# Altium PCB Gear_Trak-v1.0.PcbDoc (part 5 of 5)
Units mil, origin at the board's own origin, x right, y up, seen from the top; angles counter-clockwise.
Board outline 1383 x 2953 mil, 6 copper layers (TOP LAYER, GROUND1, SIGNAL, GROUND2, POWER, BOTTOM LAYER), stack 60.865 mil thick; 166 components, 125 nets, 751 pads, 771 vias.
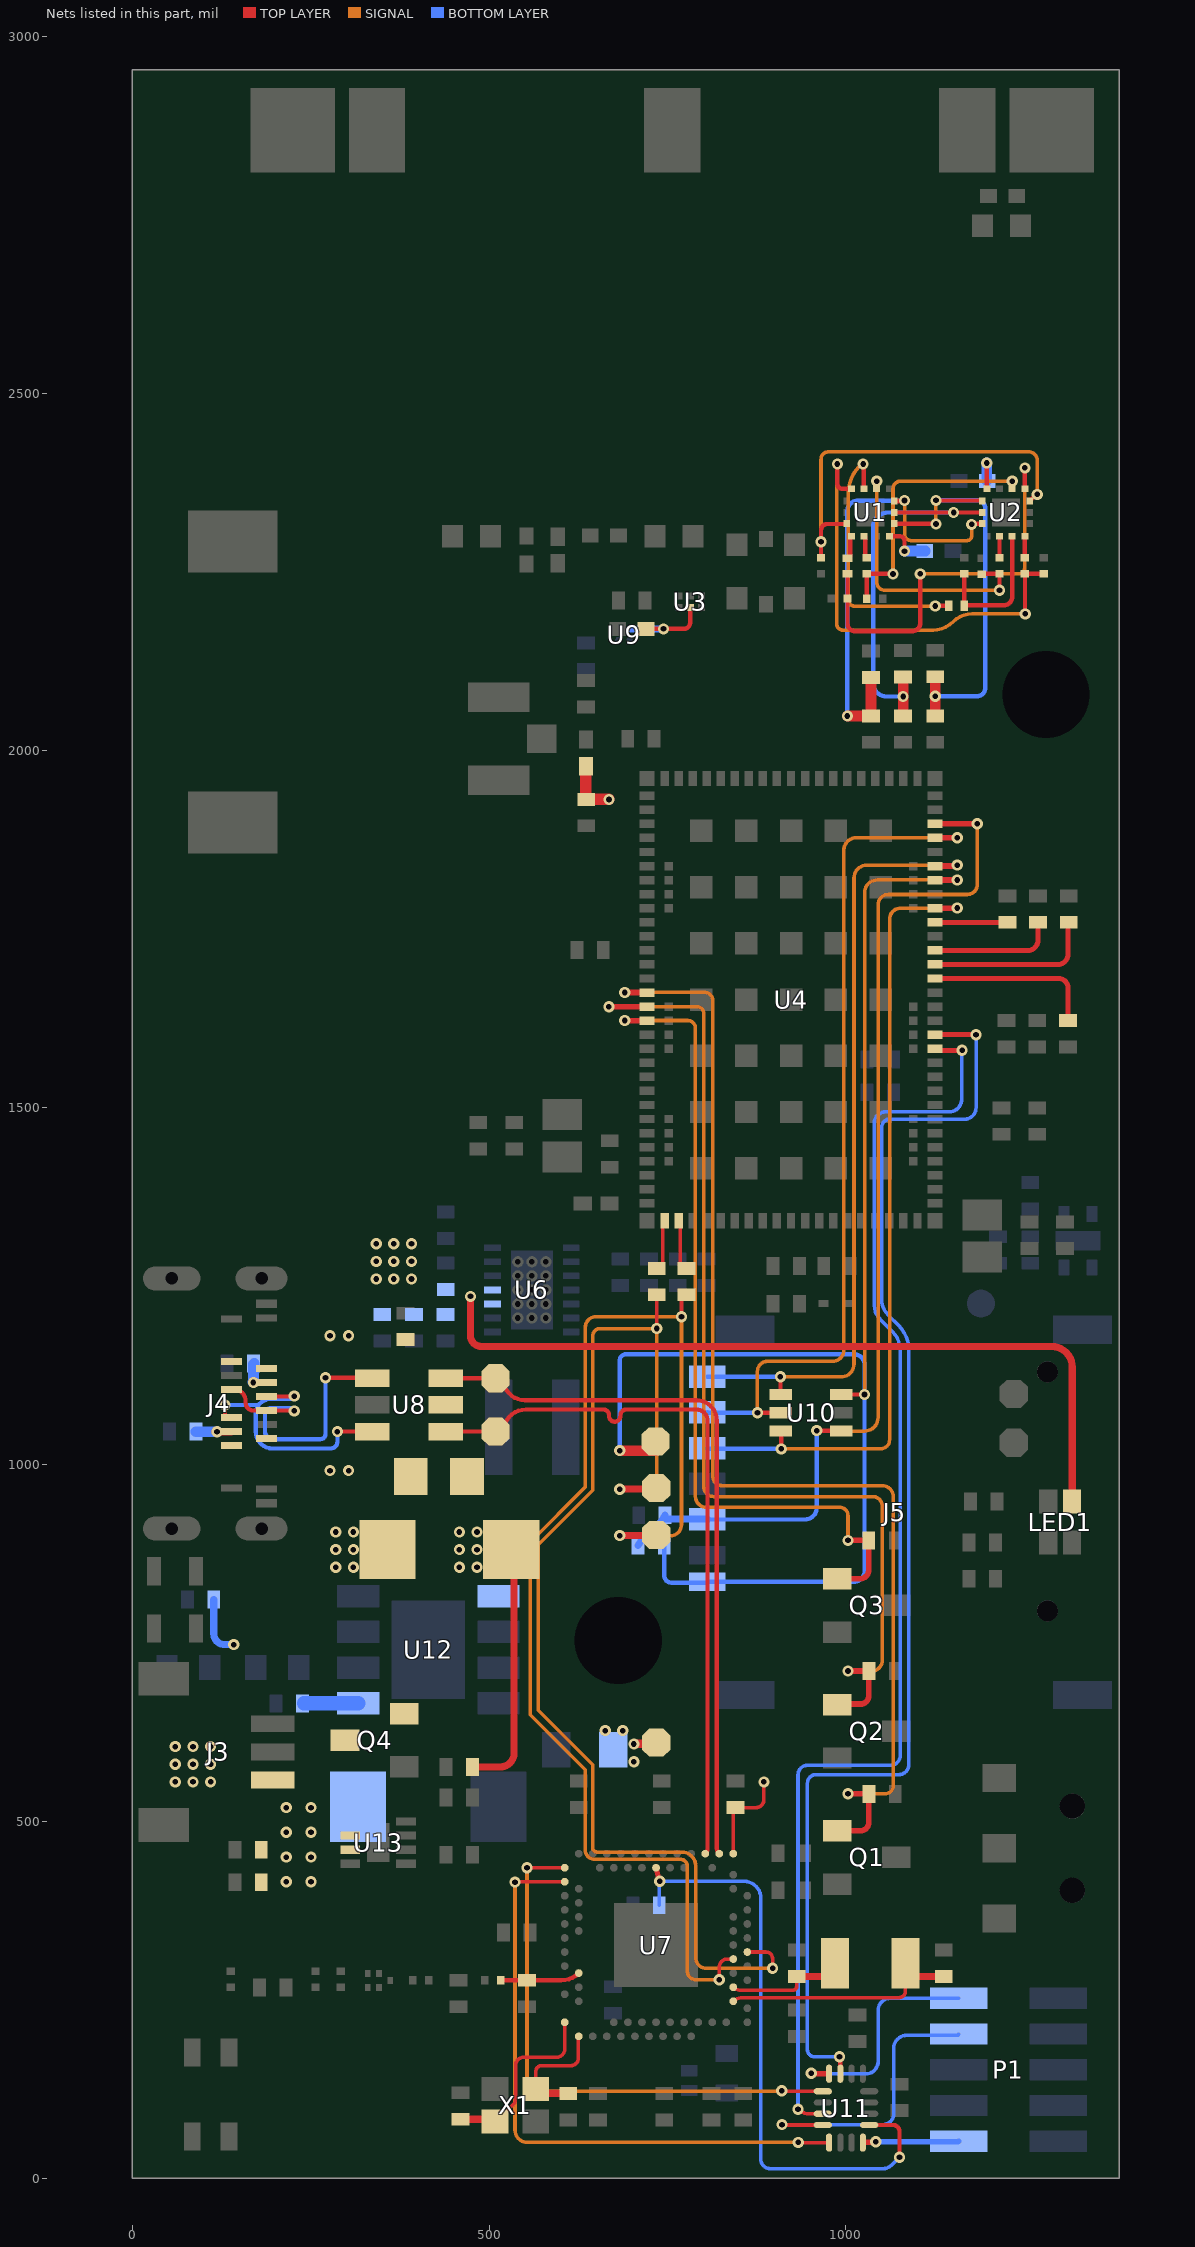
[diagram p7: the nets of this part, all layers, seen from the top]

## Via types
v1: diameter 15.75, hole 7.87, TOP LAYER to BOTTOM LAYER, tented both sides, 771 vias

## Nets (pads, with @x,y where several pads share a name; then routed paths per layer and width w, separated by ;. In a path a pad name is that pad's centre, name@x,y a point inside that pad or via, vN(x,y) a via of type N, cw(c..) or ccw(c..) an arc to the next point about the centre after c; other vN are vias at no path point) (continued)
NetR39_2: R39.2 U4.38 | length 239.8
  TOP LAYER w7: U4.38@1124.57,1680.31 1297.86,1680.31 cw(c1297.86,1667.16) 1311,1667.16 R39.2@1311,1621.25
NetR40_2: R40.2 U4.39 | length 239.8
  TOP LAYER w7: U4.39@1124.57,1699.99 1296.84,1699.99 ccw(c1296.84,1714.15) 1311,1714.15 1311,1758.05 R40.2@1312,1759.05
NetR41_2: R41.2 U4.40 | length 177.6
  TOP LAYER w7: U4.40@1124.57,1719.68 1254.68,1719.68 ccw(c1254.68,1734) 1269,1734 R41.2@1269,1759.05
NetR42_2: R42.2 U4.42 | length 101.4
  TOP LAYER w7: U4.42@1124.57,1759.05 R42.2@1226,1759.05
NetR43_1: R43.1 U4.2 | length 72.3
  TOP LAYER w5: R43.1@735,1274.29 736.97,1274.29 743.47,1280.79 743.47,1338.57 U4.2@745.83,1340.94
NetR44_1: R44.1 U4.3 | length 72.4
  TOP LAYER w5: U4.3@765.52,1340.94 767.98,1338.47 767.98,1280.79 774.48,1274.29 R44.1@776.52,1274.29
NetU4_33: U4.33 U11.3 | length 1809.9
  TOP LAYER w5: v1(932.81,96.51) ccw(c948.22,111.92) 948.22,90.13 U11.3@967.52,90.13
  TOP LAYER w7: U4.33@1124.7,1579.76 v1@1162.56,1579.76
  BOTTOM LAYER w5: v1(932.81,96.51) 932.81,565 cw(c945.89,565) 945.89,578.08 1061.87,578.08 ccw(c1061.87,592.21) 1076,592.21 1076,1159.31 ccw(c1038.43,1159.31) 1065.02,1185.85 1047.43,1203.43 ; 1047.42,1203.45 cw(c1066.07,1222.07) 1039.72,1222.07 1039.72,1477.66 cw(c1055.54,1477.66) 1055.54,1493.49 1144.54,1493.49 ccw(c1144.54,1510.94) 1162,1510.94 1162,1579.64 v1(1162.68,1579.64)
NetU4_34: U4.34 U11.15 | length 1818.2
  TOP LAYER w5.98: v1@991.9,169.94 cw(c986.14,168.31) 992.13,168.31 U11.15@992.13,146.23 ; U4.34@1124.57,1601.57 U4.34@1124.7,1601.45
  TOP LAYER w7: U4.34@1124.7,1603.45 1126.52,1601.62 1182.13,1601.62 v1(1182.19,1601.68)
  BOTTOM LAYER w5: v1(990.9,169.95) 956.05,169.95 cw(c956.05,180) 946,180 946,553.25 cw(c957.94,553.25) 957.94,565.19 1074.04,565.19 ccw(c1074.04,579.16) 1088,579.16 1088,1159.45 1088,1159.51 ccw(c1038.56,1159.49) 1073.49,1194.48 1059.19,1208.78 cw(c1081.38,1230.97) 1050,1230.97 1050,1471.94 cw(c1061.38,1471.94) 1061.38,1483.32 1166.38,1483.32 ccw(c1166.38,1499.13) 1182.19,1499.13 v1(1182.19,1601.68)
nRF52_ANT: C33.2 L13.1 U7.H23 | length 112
  TOP LAYER w6.17: L13.1@516.34,277 516.42,277.08 C33.2@553,277.08 601.38,277.08 ccw(c601.38,311.37) U7.H23@625.63,287.13
nRF52_RST: C41.1 U7.AC13 U11.9 | length 866.1
  TOP LAYER w5.98: U11.9@1032.48,74.38 1065.62,74.38 cw(c1065.62,65) 1075,65 v1(1075,29.19) v1@1075,29
  TOP LAYER w7: U7.AC13@733.9,434.76 v1@738.97,415.83
  BOTTOM LAYER w5: C41.1@738.5,382.21 738.5,415.78 v1(739.05,415.78) 857.22,415.78 cw(c857.22,392.33) 880.67,392.33 880.67,26.58 ccw(c894,26.58) 894,13.25 1052.17,13.25 ccw(c1052.17,29.19) 1063.3,17.78 v1(1075,29.19)
nRF52_SWDCLK: U7.AA24 U11.5 | length 866.9
  TOP LAYER w5: v1@536.33,415.04 605.91,415.04 U7.AA24@605.94,415.08 ; v1@933.19,49.77 U11.5@976.38,49.77
  SIGNAL w5: v1(536.33,414.65) 536.33,67.26 ccw(c553.6,67.26) 553.6,50 v1(933.19,50)
nRF52_SWDIO: U7.AC24 U11.1 | length 767.8
  TOP LAYER w5: v1@553.16,434.69 605.87,434.69 U7.AC24@605.94,434.76 ; v1@915.96,122.23 916.27,121.93 967.22,121.93 U11.1@967.52,121.62
  SIGNAL w5: v1(553.16,434.62) 553.16,137.02 ccw(c568.46,137.02) 568.46,121.72 v1@909.96,121.72
  other v1: 909.96,122.23
RESET: P1.10 U11.8 | length 135
  TOP LAYER w7.87: U11.8@1023.62,49.77 1023.62,49.9 1023.99,50.26 1041.08,50.26 v1(1041.57,50.75)
  BOTTOM LAYER w7.87: v1(1041.57,50.75) 1156.68,50.75 P1.10@1157.71,51.78
RF_SW1: R4.2 R9.1 U1.7 U2.7 | length 688.8
  TOP LAYER w6.17: v1@1175.98,2317.32 U2.7@1190.64,2317.32
  TOP LAYER w7: U1.7@1067.36,2348.82 v1@1082.02,2348.82
  TOP LAYER w15: R4.2@1032.52,2048 v1(1002,2048) 1002.13,2048.13 1002.2,2048.07 1034.94,2048.07 R4.2@1035.01,2048.13 ; R9.1@1035.01,2101.87 R4.2@1035.01,2048.13 ; R4.2@1035.5,2048.13 R4.2@1035.01,2048.13
  SIGNAL w4.92: v1@1082.02,2348.77 1082.02,2302.57 ccw(c1090.77,2302.57) 1090.77,2293.81 1169.77,2293.81 ccw(c1169.77,2300.03) 1176,2300.03 v1@1176,2317.38
  BOTTOM LAYER w6.17: v1(1002,2048) 1002,2335.05 cw(c1016.72,2335.05) 1016.72,2349.77 v1(1082.02,2349.77)
  other v1: 1175.98,2316.38
RF_SW2: R5.2 R8.1 U1.6 U2.6 | length 573.1
  TOP LAYER w6.17: U1.6@1067.41,2333.02 U2.6@1190.64,2333.02
  TOP LAYER w15: R5.2@1080.01,2048.13 v1(1080.01,2075.35) R8.1@1080.01,2102.57
  BOTTOM LAYER w6.17: v1(1080.01,2075.35) 1056.65,2075.35 cw(c1056.65,2094.04) 1037.96,2094.04 1037.96,2311.98 cw(c1059.06,2311.98) 1059.06,2333.08 v1(1150.68,2333.08)
RF_SW3: R6.2 R7.1 U1.5 U2.5 | length 614.3
  TOP LAYER w6.17: U1.5@1067.36,2317.32 1067.52,2317.16 1125.84,2317.16 v1(1126,2317) ; v1@1126,2349 v1@1126.09,2348.91 ; v1@1126.09,2349.91 U2.5@1190.55,2349.91 ; U2.5@1190.55,2348.91 U2.5@1190.64,2348.82
  TOP LAYER w15: R6.2@1125.01,2048.13 v1(1125.01,2075.57) R7.1@1125.01,2103
  SIGNAL w4.92: v1(1126,2317) v1@1126,2349
  BOTTOM LAYER w6.17: v1(1125.01,2075.57) 1183.31,2075.57 ccw(c1183.31,2087.42) 1195.17,2087.42 1195.17,2338.99 ccw(c1184.16,2338.99) 1184.16,2350 v1(1126,2350)
RXD: R43.2 TP8.1 U7.L1 | length 1705.3
  TOP LAYER w5: v1@682,965 v1(683.18,965) ; TP8.1@732.74,965 TP8.1@734.18,966.43 ; v1(735,1190) R43.2@735,1237.29 ; U7.L1@861.85,316.65 887.88,316.65 cw(c887.88,307.35) 897.19,307.35 v1(897.19,293.86)
  TOP LAYER w10: v1(683.18,965) TP8.1@732.74,965
  SIGNAL w5: v1@684,965 725,965 ccw(c725,975) 735,975 v1(735,1190) 655.94,1190 ccw(c655.94,1179.24) 645.18,1179.24 645.18,963.42 568.85,887.09 568.85,655.29 645.18,578.96 645.18,462.83 ccw(c651.35,462.83) 651.35,456.66 770.24,456.66 cw(c770.24,437.5) 789.4,437.5 789.4,308.7 ccw(c804.32,308.7) 804.32,293.77 897.1,293.77 v1(897.19,293.86)
SIM_1V8: C59.2 J5.C1 R17.1 U4.49 U10.1 | length 1537.7
  TOP LAYER w5.98: v1(959,1047) 959.3,1046.7 993.03,1046.7 U10.1@993.32,1046.41
  TOP LAYER w7.87: U4.49@1124.71,1896.98 1124.76,1896.92 1183.92,1896.92 v1(1184,1897)
  SIGNAL w5: v1(959,1047) 959,1046.35 1026,1046.35 ccw(c1026,1065.35) 1045,1065.35 1045,1784 cw(c1059,1784) 1059,1798 1170,1798 ccw(c1170,1812) 1184,1812 v1(1184,1897)
  BOTTOM LAYER w5.98: J5.C1@805.94,922.56 942.46,922.56 ccw(c942.46,939.1) 959,939.1 v1(959,1047)
  BOTTOM LAYER w10: R17.1@708.5,886 715,896 740.18,918.38 C59.2@746.68,928.38 ; C59.2@746.68,923.38 805.11,923.38 cw(c805.11,922.56) J5.C1@805.94,922.56
SIM_CLK: J5.C3 U4.46 U10.4 | length 1107.7
  TOP LAYER w5.98: v1(908.18,1122.56) 908.18,1098.09 U10.4@908.68,1097.59
  TOP LAYER w7.87: U4.46@1124.71,1837.92 v1@1155.87,1837.92
  SIGNAL w5: v1(908.18,1122.56) 992.79,1122.21 ccw(c992.97,1140.44) 1011.2,1140.44 1011.2,1821 cw(c1029.26,1821) 1029.26,1839.06 v1@1156,1839.06
  BOTTOM LAYER w5.98: J5.C3@805.94,1122.56 v1(908.18,1122.56)
  other v1: 1156,1839.16
SIM_DET: J5.CD R17.2 TP2.1 U4.45 U10.3 | length 2066.7
  TOP LAYER w5.98: U10.3@993.32,1097.59 v1(1026,1097.59)
  TOP LAYER w7.87: U4.45@1124.71,1818.24 v1@1155.87,1818.24
  TOP LAYER w15: v1(683,1019) TP2.1@734,1019
  SIGNAL w5: v1(1026,1097.59) 1026,1800.33 cw(c1044.04,1800.33) 1044.04,1818.37 v1@1156,1818.37
  BOTTOM LAYER w5.98: v1(683,1019) 683,1145 cw(c692,1145) 692,1154 1011,1154 cw(c1011,1139) 1026,1139 v1(1026,1097.59) 1026,850.76 cw(c1010.4,850.76) 1010.4,835.16 J5.CD@805.94,835.16 cw(c804.78,835.16) 804.78,834 755.16,834 cw(c755.16,843.66) 745.5,843.66 R17.2@745.5,886
  other v1: 1156,1818.27
SIM_IO: J5.C7 U4.48 U10.5 | length 1199.5
  TOP LAYER w5.98: v1(876,1072) U10.5@908.68,1072
  TOP LAYER w7.87: U4.48@1124.71,1877.29 v1@1155.87,1877.29
  SIGNAL w5: v1(876,1072) 876,1130 cw(c890,1130) 890,1144 981,1144 ccw(c981,1160) 997,1160 997,1860 cw(c1014.43,1860) 1014.43,1877.43 v1(1156,1877.43)
  BOTTOM LAYER w5.98: J5.C7@805.94,1072.56 805.94,1072 v1(876,1072)
SIM_RST: J5.C2 U4.43 U10.6 | length 1152
  TOP LAYER w5.98: v1(909.17,1021.44) U10.6@909.17,1045.91
  TOP LAYER w7.87: U4.43@1124.57,1778.73 1124.71,1778.87 1155.87,1778.87 v1(1156,1779)
  SIGNAL w5: v1(909.17,1021.44) 1048.44,1021.44 ccw(c1048.44,1034) 1061,1034 1061,1763 cw(c1077,1763) 1077,1779 v1(1156,1779)
  BOTTOM LAYER w5.98: J5.C2@805.94,1022.56 ccw(c807.05,1022.56) 807.05,1021.44 v1(909.17,1021.44)
STAT_RGB_B: Q3.1 R24.2 U4.89 | length 1177.9
  TOP LAYER w7.87: v1@690.13,1621.39 U4.89@721.29,1621.39 ; Q3.1@987.81,839.63 1019.29,839.63 ccw(c1019.29,852.32) 1031.98,852.32 R24.2@1031.98,893.23 v1(1002.81,893.23) v1@1002.81,892.8
  SIGNAL w5: v1(690,1621.52) 778.06,1621.52 cw(c778.06,1610.43) 789.15,1610.43 789.15,954.55 ccw(c804.03,954.55) 804.09,939.68 990.87,939.68 cw(c990.87,927.74) 1002.81,927.74 v1(1002.81,893.23)
STAT_RGB_G: Q2.1 R23.2 U4.88 | length 1508
  TOP LAYER w7.87: v1(667.93,1640.74) U4.88@721.23,1640.74 ; Q2.1@987.81,663.23 988.59,664 1020.47,664 ccw(c1020.47,675.52) 1031.99,675.52 R23.2@1031.99,710.23 v1(1002.82,710.23)
  SIGNAL w5: v1(667.93,1640.74) 791.52,1640.74 cw(c791.52,1631.36) 800.9,1631.47 800.9,968.56 ccw(c814.79,968.56) 814.79,954.68 1037.27,954.68 cw(c1037.27,941.01) 1050.94,941.01 1050.94,725.83 cw(c1034.96,725.83) 1034.96,709.84 1002.82,709.84 v1(1002.82,710.23)
STAT_RGB_R: Q1.1 R22.2 U4.87 | length 1691.2
  TOP LAYER w7.87: v1@690.27,1660.62 U4.87@721.43,1660.62 ; Q1.1@987.81,486.63 1020.47,486.63 ccw(c1020.47,498.15) 1031.99,498.15 R22.2@1031.99,538.23 v1(1002.82,538.23)
  SIGNAL w5: v1(690.13,1660.76) 802.6,1660.76 cw(c802.6,1650.25) 813.1,1650.25 813.1,983.78 ccw(c826.91,983.78) 826.91,969.98 1050.75,969.98 cw(c1050.75,954.49) 1066.24,954.49 1066.24,549.73 cw(c1054.74,549.73) 1054.74,538.23 v1(1002.82,538.23)
SWDCLK: P1.4 U11.4 | length 416.8
  TOP LAYER w5: v1@910.4,74.38 U11.4@967.52,74.38
  TOP LAYER w7.87: v1@910.4,74.38 v1(910.4,74.99)
  BOTTOM LAYER w5: v1(910.4,74.99) 1051.75,74.99 ccw(c1051.75,90.13) 1066.89,90.13 1066.89,181.89 cw(c1085,181.89) 1085,200 1155.93,200 ccw(c1155.93,201.78) P1.4@1157.71,201.78
SWDIO: P1.2 U11.16 | length 323.8
  TOP LAYER w7.87: v1(951.29,146.72) 951.29,146.23 U11.16@976.38,146.23
  BOTTOM LAYER w5: v1(951.29,146.72) 951.29,146.1 1027.95,146.1 ccw(c1027.95,163.15) 1045,163.15 1045,235 cw(c1061.78,235) 1061.78,251.78 P1.2@1157.71,251.78
T1A: L5.2 R10.2 U2.1 | length 573.1
  TOP LAYER w6.17: R10.2@1002.15,2247.18 L5.2@1002.15,2212.6 1002.15,2177.32 ccw(c1012.69,2177.32) 1012.69,2166.78 1092.69,2166.78 ccw(c1092.69,2178.09) 1104,2178.09 v1(1104,2247.04) ; U2.1@1250.53,2366.39 v1@1250.53,2395.44
  SIGNAL w5: v1(1104,2247.04) 1240.93,2247.04 ccw(c1240.93,2256.59) 1250.48,2256.59 1250.48,2395.49 v1(1250.58,2395.49)
T1F: R10.1 U1.1 | length 33.2
  TOP LAYER w6.17: R10.1@1002.15,2268.84 1005.74,2272.43 1005.74,2298.03 U1.1@1007.52,2299.8
T2A: C3.1 L2.2 U2.2 | length 375.3
  TOP LAYER w5: U2.2@1232.76,2366.34 U2.2@1233,2366.34
  TOP LAYER w6.17: L2.2@1029,2212 C3.1@1029,2247.04 1065.77,2247.04 v1(1065.87,2246.94) ; U2.2@1233,2366.34 v1(1233,2377)
  SIGNAL w5: v1(1065.87,2246.94) 1065.87,2365.98 cw(c1076.88,2365.98) 1076.88,2377 v1(1233,2377)
T2F: C3.2 U1.2 | length 31
  TOP LAYER w6.17: U1.2@1025.23,2299.8 1026.83,2298.2 C3.2@1026.83,2269.48
T3F: C7.1 U1.14 U2.14 | length 573.1
  TOP LAYER w6.17: C7.1@965,2269.48 v1(965,2292) 965,2308 cw(c974,2308) 974,2317 1000.82,2317 U1.14@1000.82,2317.32 ; U1.14@1000.82,2316.9 U1.14@1001.18,2316.9 ; U2.14@1256.82,2349.24 v1@1267.73,2358.39
  SIGNAL w5: v1(965,2292) 965,2407.08 cw(c976.18,2407.08) 976.18,2418.26 1255.73,2418.26 cw(c1255.73,2406.19) 1267.8,2406.19 v1@1267.8,2358.62
  other v1: 1268.03,2358.39
T4A: C2.1 U2.9 | length 30.3
  TOP LAYER w6.17: C2.1@1215.05,2269.48 U2.9@1215.05,2299.8
T4F: C2.2 L3.2 U1.9 | length 368
  TOP LAYER w6.17: L3.2@1190.37,2246.8 1190.37,2247.04 C2.2@1215.05,2247.04 v1(1215,2224)
  SIGNAL w5: v1(1043,2377) 1043,2235.66 ccw(c1054.66,2235.66) 1054.66,2224 v1(1215,2224)
T5A: C4.1 U2.11 | length 30.4
  TOP LAYER w6.17: C4.1@1250.48,2269.41 U2.11@1250.48,2299.8
T5F: C4.2 L4.2 U1.11 | length 633.5
  TOP LAYER w6.17: v1(988,2401) 988,2372.94 ccw(c994.6,2372.94) 994.6,2366.34 U1.11@1007.52,2366.34 ; C4.2@1250.48,2247.1 1277.21,2247.1 L4.2@1277.21,2247.35 ; v1@1250.74,2191 C4.2@1250.74,2246.8
  SIGNAL w5: v1(988,2401) 987,2400 987,2177.09 ccw(c995.73,2177.09) 995.73,2168.36 1121.9,2168.36 ccw(c1121.9,2208.1) 1150,2180 cw(c1176.56,2153.44) 1176.56,2191 v1(1251,2191)
T6A: C24.2 R1.2 U2.10 | length 202.2
  TOP LAYER w6.17: C24.2@1165.69,2247.04 1165.69,2204.5 ccw(c1167.19,2204.5) 1167.19,2203 1220.93,2203 ccw(c1220.93,2214.84) 1232.76,2214.84 U2.10@1232.76,2299.8
T6F: R1.1 U1.10 | length 378.5
  TOP LAYER w6.17: v1(1024,2401) 1024.62,2400.38 1024.62,2366.96 U1.10@1025.23,2366.34 ; v1(1125,2202) 1125.25,2202.25 1143.79,2202.25 R1.1@1144.04,2202.5
  SIGNAL w5: 1003.46,2360.92 1003.46,2210.25 ccw(c1011.71,2210.25) 1011.71,2202 v1(1125,2202) ; 1003.46,2360.95 cw(c1055.39,2360.98) 1018.21,2397.24 cw(c1029.65,2385.94) 1023.72,2400.89 v1(1024,2401)
TXD: R44.2 TP9.1 U7.K2 | length 1807
  TOP LAYER w5: TP9.1@733.18,900 ccw(c733.18,901) TP9.1@734.18,901 ; v1(769.59,1206.65) R44.2@769.59,1237.29 ; R44.2@776.52,1237.29 R44.2@776.59,1237.29 ; v1(822.53,277.81) 822.53,295.46 cw(c833.88,295.46) 833.88,306.81 U7.K2@842.17,306.81
  TOP LAYER w10: v1(683,900) TP9.1@733.18,900
  SIGNAL w5: v1(683,900) 683,899.68 753.86,899.68 ccw(c753.86,915.41) 769.59,915.41 v1(769.59,1206.65) 649.83,1206.65 ccw(c649.83,1191.78) 634.97,1191.78 634.97,967.97 557.85,890.85 557.85,648.94 634.97,571.82 634.97,457.6 ccw(c647.82,459.62) 647.82,446.61 767.87,446.61 cw(c767.87,436.67) 777.81,436.67 777.81,289.77 ccw(c789.77,289.77) 789.77,277.81 v1(822.53,277.81)
TYPEC_CC1: J4.A5 R15.1 | length 46.3
  TOP LAYER w10: v1@170.06,1114.47 J4.A5@188.54,1114.53
  TOP LAYER w15: v1(170,1114.41) v1@170.06,1114.47
  BOTTOM LAYER w15: v1@169.41,1115 v1(170,1114.41) 170.14,1114.56 170.14,1140.14 R15.1@171,1141
TYPEC_CC2: J4.B5 R16.1 | length 50.4
  TOP LAYER w10: v1@119.14,1045.45 J4.B5@139.14,1045.45
  TOP LAYER w15: v1(119,1045.3) v1@119.14,1045.45
  BOTTOM LAYER w7: R16.1@89.5,1045.3 R16.1@89.5,1046
  BOTTOM LAYER w15: R16.1@89.5,1045.3 v1(119,1045.3)
TYPEC_D_N: J4.A7 J4.B7 U8.1 | length 416.6
  TOP LAYER w5.9: J4.B7@139.32,1104.69 142.74,1104.69 cw(c142.74,1088.43) 152.2,1101.65 cw(c142.74,1088.43) 155.96,1097.89 cw(c142.74,1088.43) 159,1088.43 159,1086.16 ccw(c170,1086.16) 160.67,1080.33 ccw(c170,1086.16) 164.17,1076.83 ccw(c170,1086.16) 170,1075.16 J4.A7@188.54,1075.16 227,1075.16 v1(227,1074.63) ; v1(271,1121) 335.83,1121 U8.1@336.43,1120.4
  BOTTOM LAYER w5.9: v1(227,1074.63) ccw(c223.08,1074.63) 223.08,1078.55 194.69,1078.55 ccw(c194.69,1069.86) 186,1069.86 186,1046.72 ccw(c197.72,1046.72) 197.72,1035 263.67,1035 ccw(c263.67,1042.33) 271,1042.33 v1@271,1120
TYPEC_D_P: J4.A6 J4.B6 U8.3 | length 394.1
  TOP LAYER w5.9: J4.B6@130,1067.29 v1(130,1083) ; J4.B6@137,1067.29 138.97,1065.32 J4.B6@139.32,1065.32 ; J4.A6@188.54,1094.84 227,1094.84 v1(227,1095.37) ; v1(287.6,1045.6) U8.3@336.43,1045.6
  BOTTOM LAYER w5.9: v1(130,1083) 176.1,1083 176.89,1082.2 ; v1(227,1095.37) cw(c223.08,1095.37) 223.08,1091.45 194.51,1091.45 ccw(c194.51,1070.04) 176.89,1082.2 ; v1(287.6,1045.6) 287.6,1031.6 cw(c278,1031.6) 278,1022 263.43,1022 263.43,1022.1 197.72,1022.1 cw(c196.65,1027.9) 196.6,1022 cw(c196.96,1045.86) 173.1,1045.86 173.1,1069.95 cw(c194.51,1070.04) 176.89,1082.2
TYPEC_N: TP6.1 U7.AD4 U8.6 | length 1015.7
  TOP LAYER w5.9: U8.6@439.57,1120.4 TP6.1@509,1120.4 522.1,1108.15 ccw(c550.56,1120.4) 550.56,1089.42 787.66,1089.42 790.64,1089.42 cw(c790.64,1060.97) 819.09,1060.9 819.09,1058 819.09,461.57 ccw(c824.88,461.57) 820.78,457.48 821.54,456.72 cw(c819.26,454.45) U7.AD4@822.48,454.45
TYPEC_P: TP7.1 U7.AD6 U8.4 | length 1015.8
  TOP LAYER w5.9: U8.4@439.57,1045.6 TP7.1@509,1045.6 522.66,1057.29 cw(c551.29,1045.6) 551.29,1076.52 641.33,1076.52 660.18,1076.52 cw(c660.18,1068.57) 668.13,1068.57 668.13,1067.42 ccw(c676.09,1067.42) 684.04,1067.42 684.04,1068.57 cw(c691.99,1068.57) 691.99,1076.52 728.6,1076.52 787.66,1076.52 790.64,1076.52 cw(c790.64,1060.97) 806.19,1060.92 806.19,1058 806.19,461.57 cw(c800.4,461.57) 804.5,457.48 803.74,456.72 ccw(c806.01,454.45) U7.AD6@802.8,454.45
VBAT: C52.2 C53.2 J3.3 L11.2 Q4.3 R26.2 TP3.1 U13.2 U13.3 | length 17.7
  TOP LAYER w11.81: v1@702.96,608.22 TP3.1@720.69,608.22
  other v1: 216,414.94 250.69,414.94 216,449.63 250.69,449.63 216,484.32 250.69,484.32 216,519 250.69,519 702.96,583.32 702.96,608 662.67,626.84 687.35,626.84
VBUS: C51.2 C55.1 D2.1 FB2.2 R12.1 R25.1 U7.AD2 U12.1 U12.5 | length 652.8
  TOP LAYER w5: U7.AD2@842.17,454.45 C55.1@842.17,519 ; C55.1@845.4,519 874,519 ccw(c874,530) 885,530 v1(885,555)
  TOP LAYER w10: R12.1@476.73,575.9 515.9,575.9 ccw(c515.9,595) 535,595 535,876.96 ccw(c531.15,876.96) D2.1@531.15,880.81
  BOTTOM LAYER w10: R25.1@114.4,810.37 114.4,762.43 ccw(c129.55,762.43) 129.55,747.28 v1(142.28,747.28)
  BOTTOM LAYER w20: C51.2@240.92,665 U12.1@316.67,665
  other v1: 60.63,555 85.32,555 110,555 60.63,579.69 85.32,579.69 110,579.69 60.63,604.37 85.32,604.37 110,604.37 458.54,855.63 483.23,855.63 458.54,880.32 483.23,880.32 458.54,905 483.23,905
VBUS-TYPEC: C50.1 FB2.1 J4.A4 J4.A9 J4.B4 J4.B9 U8.5
  other v1: 277.28,991.03 303.32,991.03 277.28,1180 303.32,1180
VDD_RF_FE: C5.1 C6.1 C10.2 C11.2 L9.1 U1.4 U2.4 U3.2 U9.A1 | length 344.1
  TOP LAYER w6.17: C11.2@719.69,2170 v1(744.34,2170) 772.58,2170 ccw(c772.58,2179.3) 781.88,2179.3 U3.2@781.88,2200.3 ; U1.4@1060.66,2299.8 1075.2,2299.8 cw(c1075.2,2293) 1082,2293 v1(1082,2279) ; U2.4@1197.33,2366.34 v1(1197.33,2402.4)
  TOP LAYER w15.75: C10.2@635.64,1931.24 L9.1@635.64,1977.54 ; C10.2@636.1,1931.24 668,1931.24 v1(668,1931)
  BOTTOM LAYER w6.17: C5.1@1197.33,2377.53 C5.1@1197.86,2377
  BOTTOM LAYER w10: U9.A1@697.05,2170 v1(744.34,2170)
  BOTTOM LAYER w15: v1(1082,2279) C6.1@1110.31,2279 C6.1@1111,2279 ; C5.1@1197.33,2377.53 v1(1197.33,2402.4)
VSYS: C39.2 C43.2 C44.2 D2.2 LED1.4 Q4.2 R11.2 U6.10 U6.11 | length 1111.3
  TOP LAYER w10: v1(474,1235) 474,1180.05 ccw(c489.14,1180.05) 489.14,1164.92 1288.08,1164.92 cw(c1288.08,1136.09) 1316.91,1136.09 LED1.4@1316.91,947.72
  other v1: 285.31,855.63 310,855.63 285.31,880.32 310,880.32 285.31,905 310,905 342,1259.32 366.69,1259.32 391.37,1259.32 342,1284 366.69,1284 391.37,1284 342,1308.69 366.69,1308.69 391.37,1308.69
XC1: C28.1 U7.B24 X1.1 | length 260.7
  TOP LAYER w5: X1.1@505.32,82.5 cw(c505.32,79.36) X1.1@508.46,79.36 510.43,79.36 533.4,102.33 ccw(c524.31,111.45) 537.18,111.45 537.18,157.91 cw(c548.67,157.91) 548.67,169.4 595,169.4 ccw(c595,180.34) 605.94,180.34 U7.B24@605.94,218.23
  TOP LAYER w10: C28.1@460,82.5 X1.1@505.32,82.5
XC2: C27.1 U7.A23 X1.3 | length 173.7
  TOP LAYER w5: X1.3@571.38,118.8 X1.3@565.54,124.64 565.54,149.33 cw(c573.83,149.33) 573.83,157.61 614.89,157.61 ccw(c614.89,167.72) 625,167.72 625,198.54 U7.A23@625.63,198.54
  TOP LAYER w10: X1.3@571.38,118.8 C27.1@610.7,118.8
XL1: C56.2 U7.D2 X2.1 | length 351.1
  TOP LAYER w5: U7.D2@842.17,247.76 842.85,247.76 cw(c855.31,235.29) 855.31,252.92 1074.41,252.92 ccw(c1074.41,261.72) 1083.21,261.72 X2.1@1083.21,301
  TOP LAYER w10: X2.1@1083.21,301 ccw(c1101.71,301) 1101.71,282.5 C56.2@1137,282.5
XL2: C26.2 U7.F2 X2.2 | length 171.4
  TOP LAYER w5: U7.F2@842.17,267.44 ccw(c852.89,278.16) 852.89,263 925.19,263 ccw(c925.19,268.81) 931,268.81 C26.2@931,282.5
  TOP LAYER w10: C26.2@931,282.5 966.29,282.5 ccw(c966.29,301) X2.2@984.79,301
pads on no net: A1.0 A1.3 A1.4 ANT1.2 J4.A8 J4.B8 J5. J5.C6 P1.6 P1.7 P1.8 SW1. U1. U1.3 U1.8 U1.12 U2. U2.3 U2.8 U2.12 U4.4 U4.10 U4.15 U4.16 U4.18 U4.23 U4.24 U4.25 U4.26 U4.28 U4.51 U4.57 U4.58 U4.59 U4.64 U4.70 U4.71 U4.73 U4.83 U4.86 U4.95 U4.96 U4.97 U4.99 U4.100 U4.104 U4.105 U4.106 U4.107 U4.108 U4.109 U4.110 U4.111 U4.112 U4.113 U4.114 U4.115 U4.116 U4.117 U4.118 U4.119 U4.120 U4.121 U4.122 U4.123 U4.124 U4.125 U4.126 U4.127 U6.14 U7.A8 U7.A10 U7.A12 U7.A14 U7.A16 U7.A18 U7.A20 U7.AB2 U7.AC9 U7.AC11 U7.AC19 U7.AD8 U7.AD12 U7.AD20 U7.B9 U7.B11 U7.B13 U7.B15 U7.B17 U7.B19 U7.G1 U7.H2 U7.J1 U7.J24 U7.L24 U7.M2 U7.N1 U7.R24 U7.T23 U7.U1 U7.V23 U7.W24 U11.11 U11.12 U11.13

## Polygon pours and split planes (outlines as drawn)
VBUS-TYPEC on TOP LAYER "NONET_L-01_P-001" (solid, pour order 8): 217,1129.29 217,1137 cw(c228,1137) 228,1148 359,1148 cw(c359,1136) 371,1136 371,1088.5 371,1025 cw(c360,1025) 360,1014 213,1014 cw(c213,1024) 203,1024 203,1040.71 173.77,1040.71 173.77,1030.87 124.56,1030.87 124.56,991.44 ccw(c133,991.44) 133,983 290,983 cw(c290,970) 303,970 303,947 ccw(c313,947) 313,937 419,937 ccw(c419.01,948.99) 431,949 431,1008.77 418.5,1008.77 cw(c418.5,1021.27) 406,1021.27 406,1034.89 406,1061 cw(c416,1061) 416,1071 434.8,1071 463.59,1071 463.59,1095.2 415.56,1095.2 cw(c415.56,1105.6) 405.16,1105.6 405.16,1178.84 ccw(c392.51,1178.84) 392.5,1191.5 132.5,1191.5 ccw(c132.5,1183) 124,1183 124,1139.13 159.09,1139.13 159.09,1129.29
GND on TOP LAYER "NONET_L-01_P-001" (solid, pour order 13): 0,739 0,1121 0,2455 1383,2455 1383,0 0,0
GND on GROUND1 "NONET_L-01_P-001" (solid, pour order 1): 0,199 0,0 1383,0 1383,2455 0,2455 0,1121 0,739
GND on BOTTOM LAYER "NONET_L-01_P-001" (solid, pour order 14): 0,739 0,1121 0,2455 1383,2455 1383,0 0,0
VBAT on BOTTOM LAYER "NONET_L-01_P-001" (solid, pour order 3): 355.94,569.21 209.6,569.21 ccw(c209.6,554.54) 194.93,554.54 194.93,398.11 ccw(c210.04,398.11) 210.04,383 355.25,383 ccw(c355.25,397.75) 370,397.75 370,555.16 ccw(c355.95,555.16)
+3V3 on POWER "NONET_L-01_P-001" (solid, remove dead copper, pour order 9): 0,199 309,199 309,0 1383,0 1383,2455 0,2455 0,2382 433.61,2382 433.61,829 0,829
VDD_RF_FE on POWER "VDD_RF_FE_L05_P005" (solid, pour order 5): 605,1906 605,2456 1383,2456 1383,2132.5 705,2132.5 705,1906
VBAT on POWER "NONET_L-01_P-001" (solid, pour order 11): 10.2,510 197,510 197,636 857,636 857,543 368,543 368,382 10.2,382
VBUS on POWER "VBUS_L05_P007" (solid, pour order 7): 867,646 867,544 965,544 965,924.23 433.51,924.23 433.51,829 0,829 0,520 186.71,520 186.71,646
VBUS-TYPEC on POWER "NONET_L-01_P-001" (solid, pour order 4): 312,973 ccw(c312,984) 323,984 323,1178 ccw(c309.5,1178) 309.5,1191.5 246.5,1191.5 ccw(c246.5,1179) 234,1179 234,1076 234,985 ccw(c246,985) 246,973
VSYS on POWER "VSYS_L05_P006" (solid, pour order 6): 0,1325 0,839.47 423.27,839.47 423.27,1325
GND on GROUND2 "NONET_L-01_P-001" (solid, pour order 2): 0,739 0,1121 0,2455 1383,2455 1383,0 0,0
GND on SIGNAL "NONET_L-01_P-001" (solid, pour order 12): 0,739 0,1121 0,2455 1383,2455 1383,0 0,0

## Keep-outs
Keep-Out Layer:
  region: 10,1331 418,1331 418,2374 419,2375 7,2375 8.03,1330.85

## Other copper
TOP LAYER:
  rectangle net GND: 124.56,939.33 203.3,971.81
  rectangle net GND: 124.56,1198.19 203.3,1230.67
  region net GND: 732.06,1910.62 732.06,1922.43 708.05,1922.43 708.05,1910.62
  region net GND: 732.06,1890.94 732.06,1902.75 708.05,1902.75 708.05,1890.94
  region net GND: 732.06,1871.25 732.06,1883.06 708.05,1883.06 708.05,1871.25
  region net GND: 732.06,1851.57 732.06,1863.38 708.05,1863.38 708.05,1851.57
  region net GND: 732.06,1831.88 732.06,1843.69 708.05,1843.69 708.05,1831.88
  region net GND: 732.06,1812.2 732.06,1824.01 708.05,1824.01 708.05,1812.2
  region net GND: 732.06,1792.51 732.06,1804.32 708.05,1804.32 708.05,1792.51
  region net GND: 732.06,1772.83 732.06,1784.64 708.05,1784.64 708.05,1772.83
  region net GND: 732.06,1753.14 732.06,1764.95 708.05,1764.95 708.05,1753.14
  region net GND: 732.06,1694.09 732.06,1705.9 708.05,1705.9 708.05,1694.09
  region net GND: 732.06,1595.66 732.06,1607.47 708.05,1607.47 708.05,1595.66
  region net GND: 732.06,1516.92 732.06,1528.73 708.05,1528.73 708.05,1516.92
  region net GND: 732.06,1438.18 732.06,1449.99 708.05,1449.99 708.05,1438.18
  region net GND: 810.79,1351.57 798.98,1351.57 798.98,1327.56 810.79,1327.56
  region net GND: 830.48,1351.57 818.67,1351.57 818.67,1327.56 830.48,1327.56
  region net GND: 889.52,1351.55 877.71,1351.55 877.71,1327.54 889.52,1327.54
  region net GND: 869.85,1351.57 858.04,1351.57 858.04,1327.56 869.85,1327.56
  region net GND: 850.15,1351.55 838.34,1351.55 838.34,1327.54 850.15,1327.54
  region net GND: 928.9,1351.57 917.09,1351.57 917.09,1327.56 928.9,1327.56
  region net GND: 987.96,1351.57 976.15,1351.57 976.15,1327.56 987.96,1327.56
  region net GND: 1047.16,1351.72 1035.35,1351.72 1035.35,1327.71 1047.16,1327.71
  region net GND: 1113.98,1469.68 1113.98,1457.87 1137.99,1457.87 1137.99,1469.68
  region net GND: 1113.94,1548.42 1113.94,1536.61 1137.95,1536.61 1137.95,1548.42
  region net GND: 1113.94,1646.84 1113.94,1635.03 1137.95,1635.03 1137.95,1646.84
  region net GND: 1113.94,1745.27 1113.94,1733.46 1137.95,1733.46 1137.95,1745.27
  region net GND: 1113.94,1804.32 1113.94,1792.51 1137.95,1792.51 1137.95,1804.32
  region net GND: 1113.94,1863.38 1113.94,1851.57 1137.95,1851.57 1137.95,1863.38
  region net GND: 1113.94,1922.43 1113.94,1910.62 1137.95,1910.62 1137.95,1922.43
  rectangle net GND: 956.46,1949.99 968.28,1974
  rectangle net GND: 917.09,1949.99 928.91,1974
  rectangle net GND: 897.41,1949.99 909.22,1974
  rectangle net GND: 838.35,1949.99 850.17,1974
  rectangle net GND: 858.04,1949.99 869.85,1974
  rectangle net GND: 779.3,1949.99 791.11,1974
  rectangle net GND: 798.98,1949.99 810.8,1974
  region net GND: 706.46,1978.05 706.46,1949.99 732.06,1949.99 732.06,1978.05
  region net GND: 1113.94,1978.05 1113.94,1949.99 1139.54,1949.99 1139.54,1978.05
  region net GND: 1142,1351.57 1113.94,1351.57 1113.94,1325.98 1142,1325.98
  rectangle net GND: 704,1325.98 732.06,1351.57
  rectangle net GND: 523,1184 599,1295
  rectangle net GND: 540.5,231.08 565.5,254
  rectangle net NetR30_2: 404,432 448.73,466.06
  rectangle net NetR30_2: 369.86,454.25 448.73,466.06
  rectangle net GND: 282,330 360.41,446.38
  rectangle net GND: 291.9,493.62 360.41,505.43
  rectangle net NetC35_2: 316.8,260.1 334.03,273.92
  region net +3V3: 634.87,1452.13 cw(c634.87,1443) 644,1443 644,1355 cw(c633,1355) 633,1344 464,1344 cw(c464,1354) 454,1354 454,1440 cw(c466.13,1440) 466.13,1452.13
  region net +3V3: 1150,1371.25 1326,1371.25 1326,1326 1152,1326 1152,1351 ccw(c1143.56,1351) 1143.56,1359.44 1113.94,1359.44 1113.94,1371.25
  region net VBAT: 333,524.28 330.92,519.24 327.06,515.39 322.03,513.31 287.59,513.31 284.94,513.05 280.04,511.02 276.29,507.27 275.05,504.27 275.03,504.23 274.26,502.37 274,499.71 274.27,496.99 275.06,495.07 276.35,491.95 280.21,488.1 285.24,486.02 287.96,485.75 319.46,485.75 319.46,454.25 282.25,454.25 280.64,454.09 277.67,452.86 275.39,450.58 274.16,447.61 274,446 274,383 166.49,383 166.49,571 270,571 270,628.31 333,628.31
  region net VBUS: 445.62,1008.77 445.62,839.47 570.52,839.47 570.52,1008.77
  region net VSYS: 270,922.14 270,636 401.74,636 401.74,922.14
GROUND1:
  rectangle net GND: 517,1173 612,1309
POWER:
  rectangle net VDD_RF_FE: 701.55,2070 705.89,2137.2
  rectangle net VDD_RF_FE: 670.85,2125.2 675.19,2137.2
  rectangle net +3V3: 455.95,1793.2 460.29,1805.2
  rectangle net +3V3: 486.65,1793.2 490.99,1805.2
  region net +3V3: 521.75,1805.2 517.41,1805.2 517.41,1793.2 521.75,1793.2
  region net +3V3: 552.45,1805.2 548.11,1805.2 548.11,1793.2 552.45,1793.2
  rectangle net +3V3: 468.8,1826.4 473.14,1838.4
  rectangle net +3V3: 499.5,1826.4 503.84,1838.4
  region net +3V3: 534.6,1838.4 530.26,1838.4 530.26,1826.4 534.6,1826.4
  region net +3V3: 565.3,1838.4 560.96,1838.4 560.96,1826.4 565.3,1826.4
  rectangle net +3V3: 455.95,1859.6 460.29,1871.6
  rectangle net +3V3: 486.65,1859.6 490.99,1871.6
  region net +3V3: 521.75,1871.6 517.41,1871.6 517.41,1859.6 521.75,1859.6
  region net +3V3: 552.45,1871.6 548.11,1871.6 548.11,1859.6 552.45,1859.6
  rectangle net +3V3: 468.8,1892.8 473.14,1904.8
  rectangle net +3V3: 499.5,1892.8 503.84,1904.8
  region net +3V3: 534.6,1904.8 530.26,1904.8 530.26,1892.8 534.6,1892.8
  region net +3V3: 565.3,1904.8 560.96,1904.8 560.96,1892.8 565.3,1892.8
  rectangle net +3V3: 455.95,1926 460.29,1938
  rectangle net +3V3: 486.65,1926 490.99,1938
  region net +3V3: 521.75,1938 517.41,1938 517.41,1926 521.75,1926
  region net +3V3: 552.45,1938 548.11,1938 548.11,1926 552.45,1926
  region net +3V3: 534.6,2170.4 530.26,2170.4 530.26,2158.4 534.6,2158.4
  region net +3V3: 503.9,2170.4 499.56,2170.4 499.56,2158.4 503.9,2158.4
  region net +3V3: 473.2,2170.4 468.86,2170.4 468.86,2158.4 473.2,2158.4
  region net +3V3: 552.45,2137.2 548.11,2137.2 548.11,2125.2 552.45,2125.2
  region net +3V3: 521.75,2137.2 517.41,2137.2 517.41,2125.2 521.75,2125.2
  rectangle net +3V3: 486.65,2125.2 490.99,2137.2
  rectangle net +3V3: 455.95,2125.2 460.29,2137.2
  rectangle net +3V3: 468.8,2092 473.14,2104
  rectangle net +3V3: 499.5,2092 503.84,2104
  rectangle net +3V3: 530.2,2092 534.54,2104
  rectangle net +3V3: 560.9,2092 565.24,2104
SIGNAL:
  rectangle net GND: 523,1181.76 591.37,1307
GROUND2:
  rectangle net GND: 512.19,1184 619,1307.87
BOTTOM LAYER:
  rectangle net GND: 1297.7,1258.9 1312.9,1319.2
  rectangle net GND: 422,699.21 542.95,730.79
  rectangle net GND: 579.69,1274 626.93,1293
  rectangle net NetL11_1: 481,514 545,691
  region net VBAT: 709,575 ccw(c709,584) 718,584 718,634 ccw(c708,634) 708,644 653,644 ccw(c653,636) 645,636 645,585 ccw(c655,585) 655,575 681.66,575
  region net NetR26_1: 631,604.24 631,584 cw(c622,584) 622,575 556.71,575 556.71,735.94 ccw(c543.65,736.15) 543.86,749.21 483.7,749.21 483.7,780.79 564.28,780.79 cw(c564.29,765.58) 579.49,765.58 579.5,712.39 579.5,657.44 ccw(c592.93,657.44) 592.93,644 620.48,644 cw(c620.48,633.48) 631,633.48
  region net +3V3: 1270.5,1309.5 1270.5,1331.5 cw(c1278,1331.5) 1278,1339 1312.8,1339 1312.8,1366.2 ccw(c1305,1366.2) 1305,1374 1207.91,1374 ccw(c1207.91,1366.98) 1200.89,1366.98 1200.89,1309.5
  region net NetC49_2: 516.69,1259.05 428.95,1259.05 cw(c428.95,1266) 422,1266 422,1325 466,1325 466,1296 ccw(c473.81,1296) 473.81,1288.19 516.69,1288.19
  region net NetL10_2: 603.31,1142.62 cw(c593.69,1142.62) 593.68,1133 577,1133 ccw(c577,1124) 568,1124 568,982.36 ccw(c578.66,982.36) 578.66,971.7 628.7,971.7 ccw(c628.7,984) 641,984 641,1209.45 603.31,1209.45
  region net NetL10_1: 516.69,1141.31 ccw(c525,1141.31) 525,1133 543,1133 cw(c543,1124) 552,1124 552,982.36 cw(c541.34,982.36) 541.34,971.7 491.3,971.7 cw(c491.3,984) 479,984 479,1209.45 516.69,1209.45
  pour cut-out: 464,465 464,702 563,702 563,465
  region net +3V3: 603.31,1268.5 880,1268.5 880,1219.69 603.31,1219.69
  region net VBUS: 483.7,799.21 483.7,830.79 445,830.79 445,935.8 542.95,935.8 542.95,799.21
  region net VBUS: 229.5,635 35,635 35,518.26 180,518.26 180,580 346.3,580 346.3,681 229.5,681
  region net VSYS: 324.8,1321 413,1321 413,1253.9 516.69,1253.9 516.69,1216 471,1216 471,1200.59 324.8,1200.59
Multi-Layer:
  pour cut-out: -2.41,958.03 -2.41,1211.97 104.87,1211.97 104.87,958.03
  pour cut-out: 681,654.57 cw(c681,753) 582.57,753 cw(c681,753) 681,851.43 cw(c681,753) 779.43,753 cw(c681,753)
  pour cut-out: 1280,1979.57 cw(c1280,2078) 1181.57,2078 cw(c1280,2078) 1280,2176.43 cw(c1280,2078) 1378.43,2078 cw(c1280,2078)
  pour cut-out: 5.13,35 5.13,199.37 308.94,199.37 308.94,35

## Silkscreen, mask and mechanical layers (free items; w line width, h text height)
Top Overlay:
  lines w5: -6,909 -56.27,909 -56.27,1261.18 -6,1261.18
  text "D-" at 543.3,1102.76 h50
  text "SCL" at 1112,1079.86 h50
  text "D+" at 543.3,1027.92 h50
  text "S_DET" at 773.15,1021.78 h50
  text "SDA" at 1116.55,1016.84 h50
  text "RXD" at 774.15,954.27 h50
  text "TXD" at 774.15,888.84 h50
  text "BATT" at 774.15,597.34 h50
Bottom Overlay:
  text "PROG" at 1271.91,313.26 h25
Board Outline:
  lines w10: 0,0 0,739 0,1121 0,2953 1383,2953 1383,0 0,0
Fabrication:
  drawing of 399 lines, arcs and shapes, not listed
  text "Layer" at 2013.74,2853 h60
  text "Name" at 2423.65,2853 h60
  text "Material" at 3353.4,2853 h60
  text "Thickness" at 4213.16,2853 h60
  text "Constant" at 4863,2853 h60
  text "Board Layer Stack" at 5432.86,2853 h60
  text "Top Overlay" at 2423.65,2733 h60
  text "Top Solder" at 2423.65,2613 h60
  text "Solder Resist" at 3353.4,2613 h60
  text "0.030mm" at 4213.16,2613 h60
  text "3.5" at 4863,2613 h60
  text "1" at 2013.74,2493 h60
  text "TOP LAYER" at 2423.65,2493 h60
  text "0.035mm" at 4213.16,2493 h60
  text "Dielectric 1" at 2423.65,2373 h60
  text "PP-015" at 3353.4,2373 h60
  text "0.099mm" at 4213.16,2373 h60
  text "4.1" at 4863,2373 h60
  text "2" at 2013.74,2253 h60
  text "GROUND1" at 2423.65,2253 h60
  text "0.015mm" at 4213.16,2253 h60
  text "CORE 1" at 2423.65,2133 h60
  text "Core-025" at 3353.4,2133 h60
  text "0.550mm" at 4213.16,2133 h60
  text "4.6" at 4863,2133 h60
  text "3" at 2013.74,2013 h60
  text "SIGNAL" at 2423.65,2013 h60
  text "CF-004" at 3353.4,2013 h60
  text "0.015mm" at 4213.16,2013 h60
  text "Dielectric 2" at 2423.65,1893 h60
  text "PP-016" at 3353.4,1893 h60
  text "0.116mm" at 4213.16,1893 h60
  text "4.16" at 4863,1893 h60
  text "4" at 2013.74,1773 h60
  text "GROUND2" at 2423.65,1773 h60
  text "CF-004" at 3353.4,1773 h60
  text "0.015mm" at 4213.16,1773 h60
  text "CORE 2" at 2423.65,1653 h60
  text "Core-025" at 3353.4,1653 h60
  text "0.550mm" at 4213.16,1653 h60
  text "4.6" at 4863,1653 h60
  text "5" at 2013.74,1533 h60
  text "POWER" at 2423.65,1533 h60
  text "0.015mm" at 4213.16,1533 h60
  text "Dielectric 3" at 2423.65,1413 h60
  text "PP-015" at 3353.4,1413 h60
  text "0.099mm" at 4213.16,1413 h60
  text "4.1" at 4863,1413 h60
  text "6" at 2013.74,1293 h60
  text "BOTTOM LAYER" at 2423.65,1293 h60
  text "0.035mm" at 4213.16,1293 h60
  text "Bottom Solder" at 2423.65,1173 h60
  text "Solder Resist" at 3353.4,1173 h60
  text "0.030mm" at 4213.16,1173 h60
  text "3.5" at 4863,1173 h60
  text "Bottom Overlay" at 2423.65,1053 h60
  text "Total board thickness:" at 2013.74,933 h60
  text "1.606mm" at 4213.16,933 h60
Drill Drawing:
  circle w10: c-352.38,4436.28 r33.33
  lines w10: -385.71,3802.94 -319.04,3802.94 -319.04,3869.61 -385.71,3869.61 -385.71,3802.94 ; -385.71,3969.61 -369.04,3969.61 -352.38,3952.94 -335.71,3969.61 -319.04,3969.61 -335.71,3986.28 -319.04,4002.94 -335.71,4002.94 -352.38,4019.61 -369.04,4002.94 -385.71,4002.94 -369.04,3986.28 -385.71,3969.61 ; -385.71,4102.94 -352.38,4119.61 -319.04,4102.94 -335.71,4136.28 -319.04,4169.61 -352.38,4152.94 -385.71,4169.61 -369.04,4136.28 -385.71,4102.94 ; -385.71,4319.61 -319.04,4319.61 -352.38,4252.94 -385.71,4319.61 ; -385.71,4569.61 -369.04,4569.61 -369.04,4552.94 -335.71,4552.94 -335.71,4569.61 -319.04,4569.61 -319.04,4602.94 -335.71,4602.94 -335.71,4619.61 -369.04,4619.61 -369.04,4602.94 -385.71,4602.94 -385.71,4569.61
  lines w15: -445.5,3757.94 7504.3,3757.94 ; -445.5,4657.94 7504.3,4657.94 ; 105.38,3607.94 105.38,4807.94 ; 705.22,3607.94 705.22,4807.94 ; 1844.88,3607.94 1844.88,4807.94 ; 2350.76,3607.94 2350.76,4807.94 ; 3084.56,3607.94 3084.56,4807.94 ; 4614.1,3607.94 4614.1,4807.94 ; 5203.95,3607.94 5203.95,4807.94 ; 5949.75,3607.94 5949.75,4807.94 ; -445.5,3607.94 7504.3,3607.94 7504.3,4807.94 -445.5,4807.94 -445.5,3607.94
  text "Symbol" at -355.5,4702.94 h72
  text "Count" at 150.38,4702.94 h72
  text "Hole Size" at 750.22,4702.94 h72
  text "Plated" at 1889.88,4702.94 h72
  text "Hole Type" at 2395.76,4702.94 h72
  text "Drill Layer Pair" at 3129.56,4702.94 h72
  text "Via/Pad" at 4659.1,4702.94 h72
  text "Pad Shape" at 5248.95,4702.94 h72
  text "Template" at 5994.75,4702.94 h72
  text "2" at 150.38,4552.94 h60
  text "17.72mil (0.450mm)" at 750.22,4552.94 h60
  text "PTH" at 1889.88,4552.94 h60
  text "Slot" at 2395.76,4552.94 h60
  text "TOP LAYER - BOTTOM LAYER" at 3129.56,4552.94 h60
  text "Pad" at 4659.1,4552.94 h60
  text "Rounded" at 5248.95,4552.94 h60
  text "r185_85h45_145r42m198_98" at 5994.75,4552.94 h60
  text "2" at 150.38,4402.94 h60
  text "17.72mil (0.450mm)" at 750.22,4402.94 h60
  text "PTH" at 1889.88,4402.94 h60
  text "Slot" at 2395.76,4402.94 h60
  text "TOP LAYER - BOTTOM LAYER" at 3129.56,4402.94 h60
  text "Pad" at 4659.1,4402.94 h60
  text "Rounded" at 5248.95,4402.94 h60
  text "r205_85h45_165r42m218_98" at 5994.75,4402.94 h60
  text "2" at 150.38,4252.94 h60
  text "29.53mil (0.750mm)" at 750.22,4252.94 h60
  text "NPTH" at 1889.88,4252.94 h60
  text "Round" at 2395.76,4252.94 h60
  text "TOP LAYER - BOTTOM LAYER" at 3129.56,4252.94 h60
  text "Pad" at 4659.1,4252.94 h60
  text "Rounded" at 5248.95,4252.94 h60
  text "c75hn75m0mx0p0" at 5994.75,4252.94 h60
  text "2" at 150.38,4102.94 h60
  text "35.43mil (0.900mm)" at 750.22,4102.94 h60
  text "NPTH" at 1889.88,4102.94 h60
  text "Round" at 2395.76,4102.94 h60
  text "TOP LAYER - BOTTOM LAYER" at 3129.56,4102.94 h60
  text "Pad" at 4659.1,4102.94 h60
  text "Rounded" at 5248.95,4102.94 h60
  text "c90hn90m0mx0p0" at 5994.75,4102.94 h60
  text "2" at 150.38,3952.94 h60
  text "122.05mil (3.100mm)" at 750.22,3952.94 h60
  text "PTH" at 1889.88,3952.94 h60
  text "Round" at 2395.76,3952.94 h60
  text "TOP LAYER - BOTTOM LAYER" at 3129.56,3952.94 h60
  text "Pad" at 4659.1,3952.94 h60
  text "Rounded" at 5248.95,3952.94 h60
  text "c0h310" at 5994.75,3952.94 h60
  text "786" at 150.38,3802.94 h60
  text "7.87mil (0.200mm)" at 750.22,3802.94 h60
  text "PTH" at 1889.88,3802.94 h60
  text "Round" at 2395.76,3802.94 h60
  text "TOP LAYER - BOTTOM LAYER" at 3129.56,3802.94 h60
  text "(Mixed)" at 4659.1,3802.94 h60
  text "Rounded" at 5248.95,3802.94 h60
  text "(Mixed)" at 5994.75,3802.94 h60
  text "796 Total" at 150.38,3652.94 h60
  text "Slot definitions :" at -355.5,3507.97 h60
  text "Routed Path Length" at 677.19,3507.97 h60
  text "= Calculated from tool start centre position to tool end centre position." at 1779.86,3507.97 h60
  text "Hole Length" at 677.19,3407.99 h60
  text "= Routed Path Length + Tool Size = Slot length as defined in the PCB layout" at 1369.99,3407.99 h60

## Dimensions
0,0 to 0,2953 on Dimensions
0,0 to 1383,0 on Dimensions

## Text inside footprints (layer, text, board x,y; h text height)
D2: Top Overlay "+" at 602.54,873.81 h39.37 r90
LED1: Top Overlay "+" at 1353,960 h39.37 r180